# Altium PCB Daughter_PCB.PcbDoc
Units mil, origin at the board's own origin, x right, y up, seen from the top; angles counter-clockwise.
Board outline 1289.97 x 1509.97 mil, 2 copper layers (Top Layer, Bottom Layer); 38 components, 20 nets, 139 pads, 36 vias.
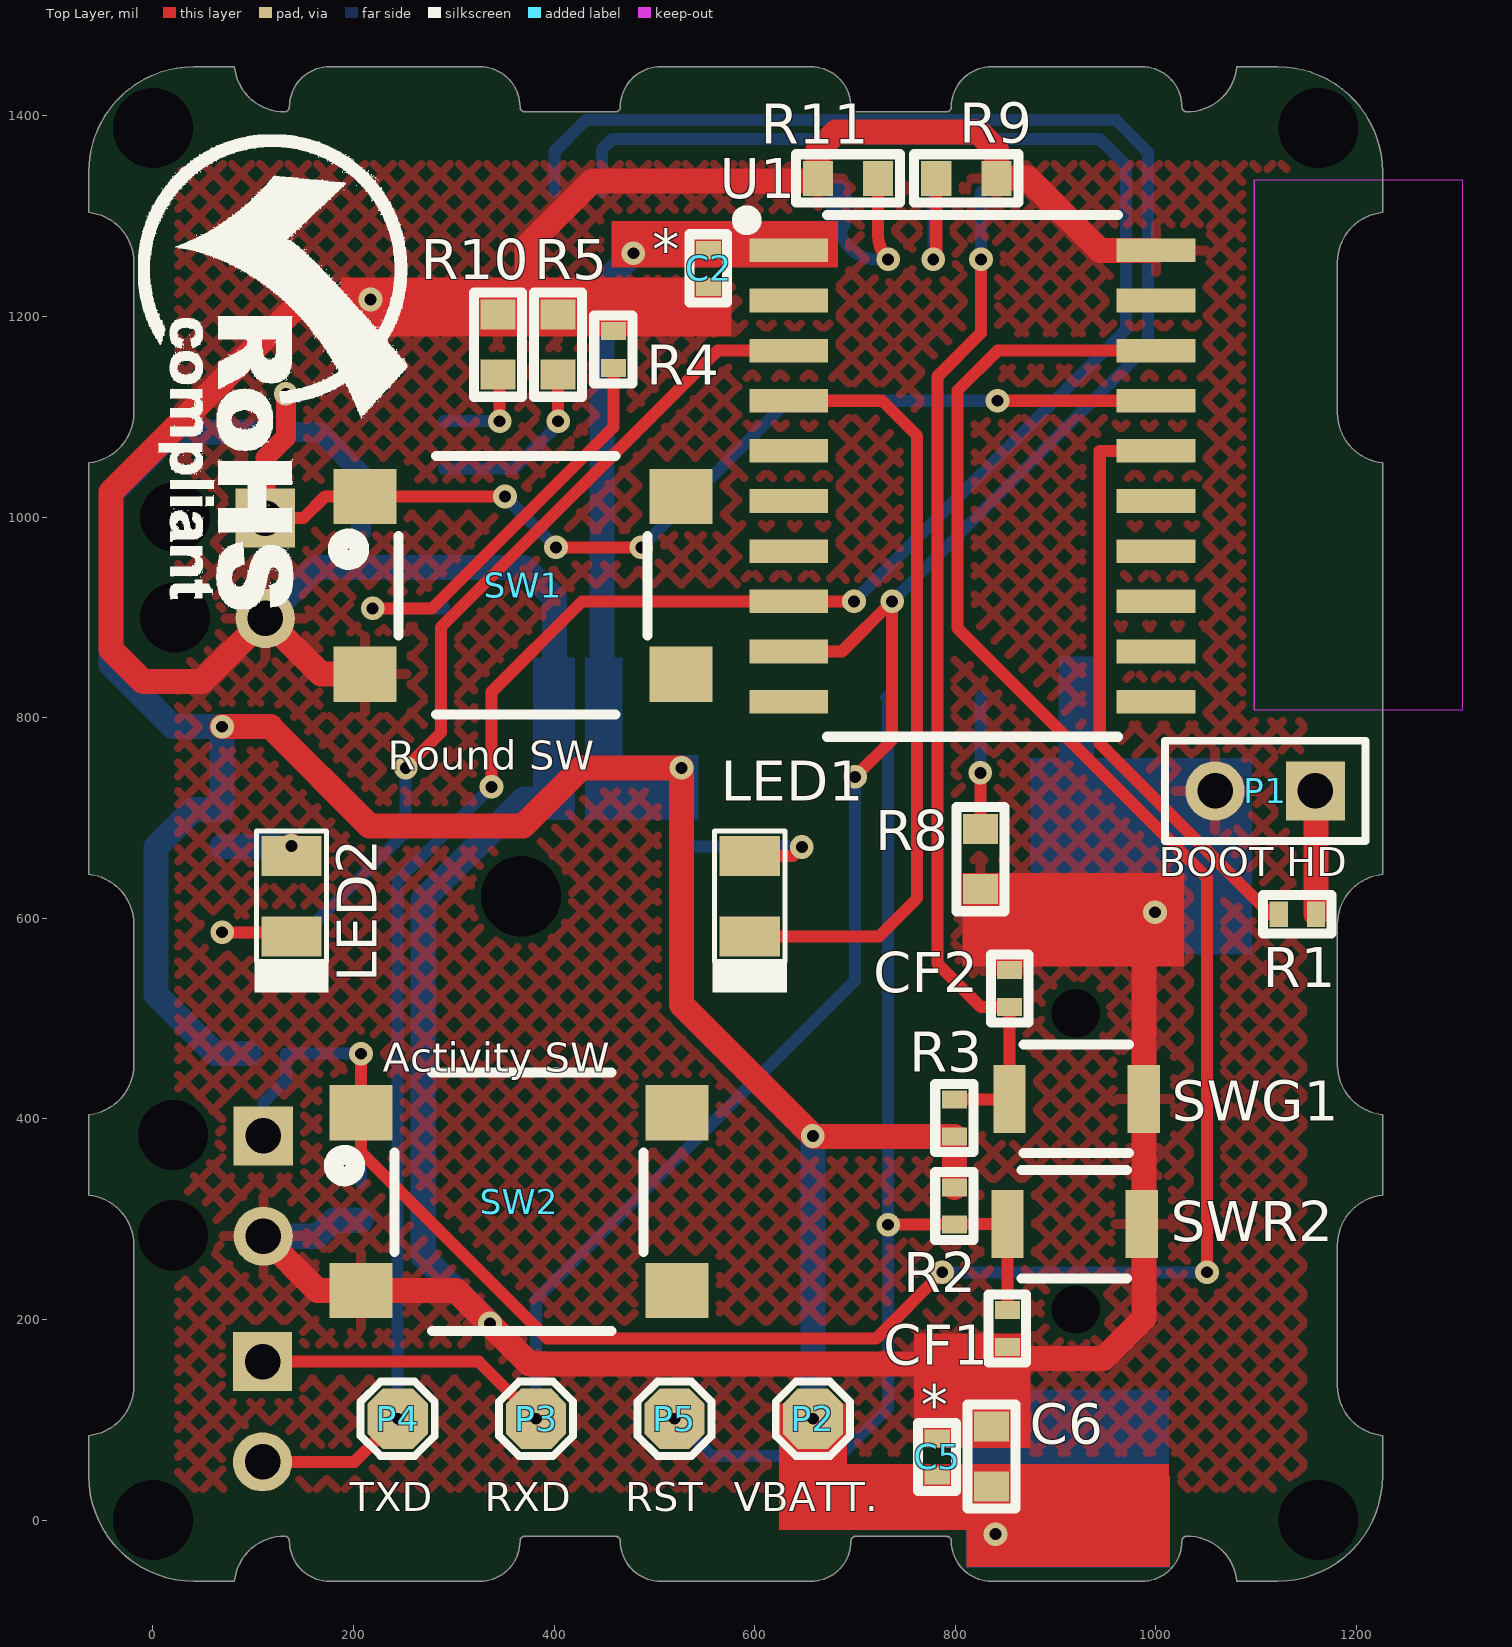
[diagram p0: Top Layer view]
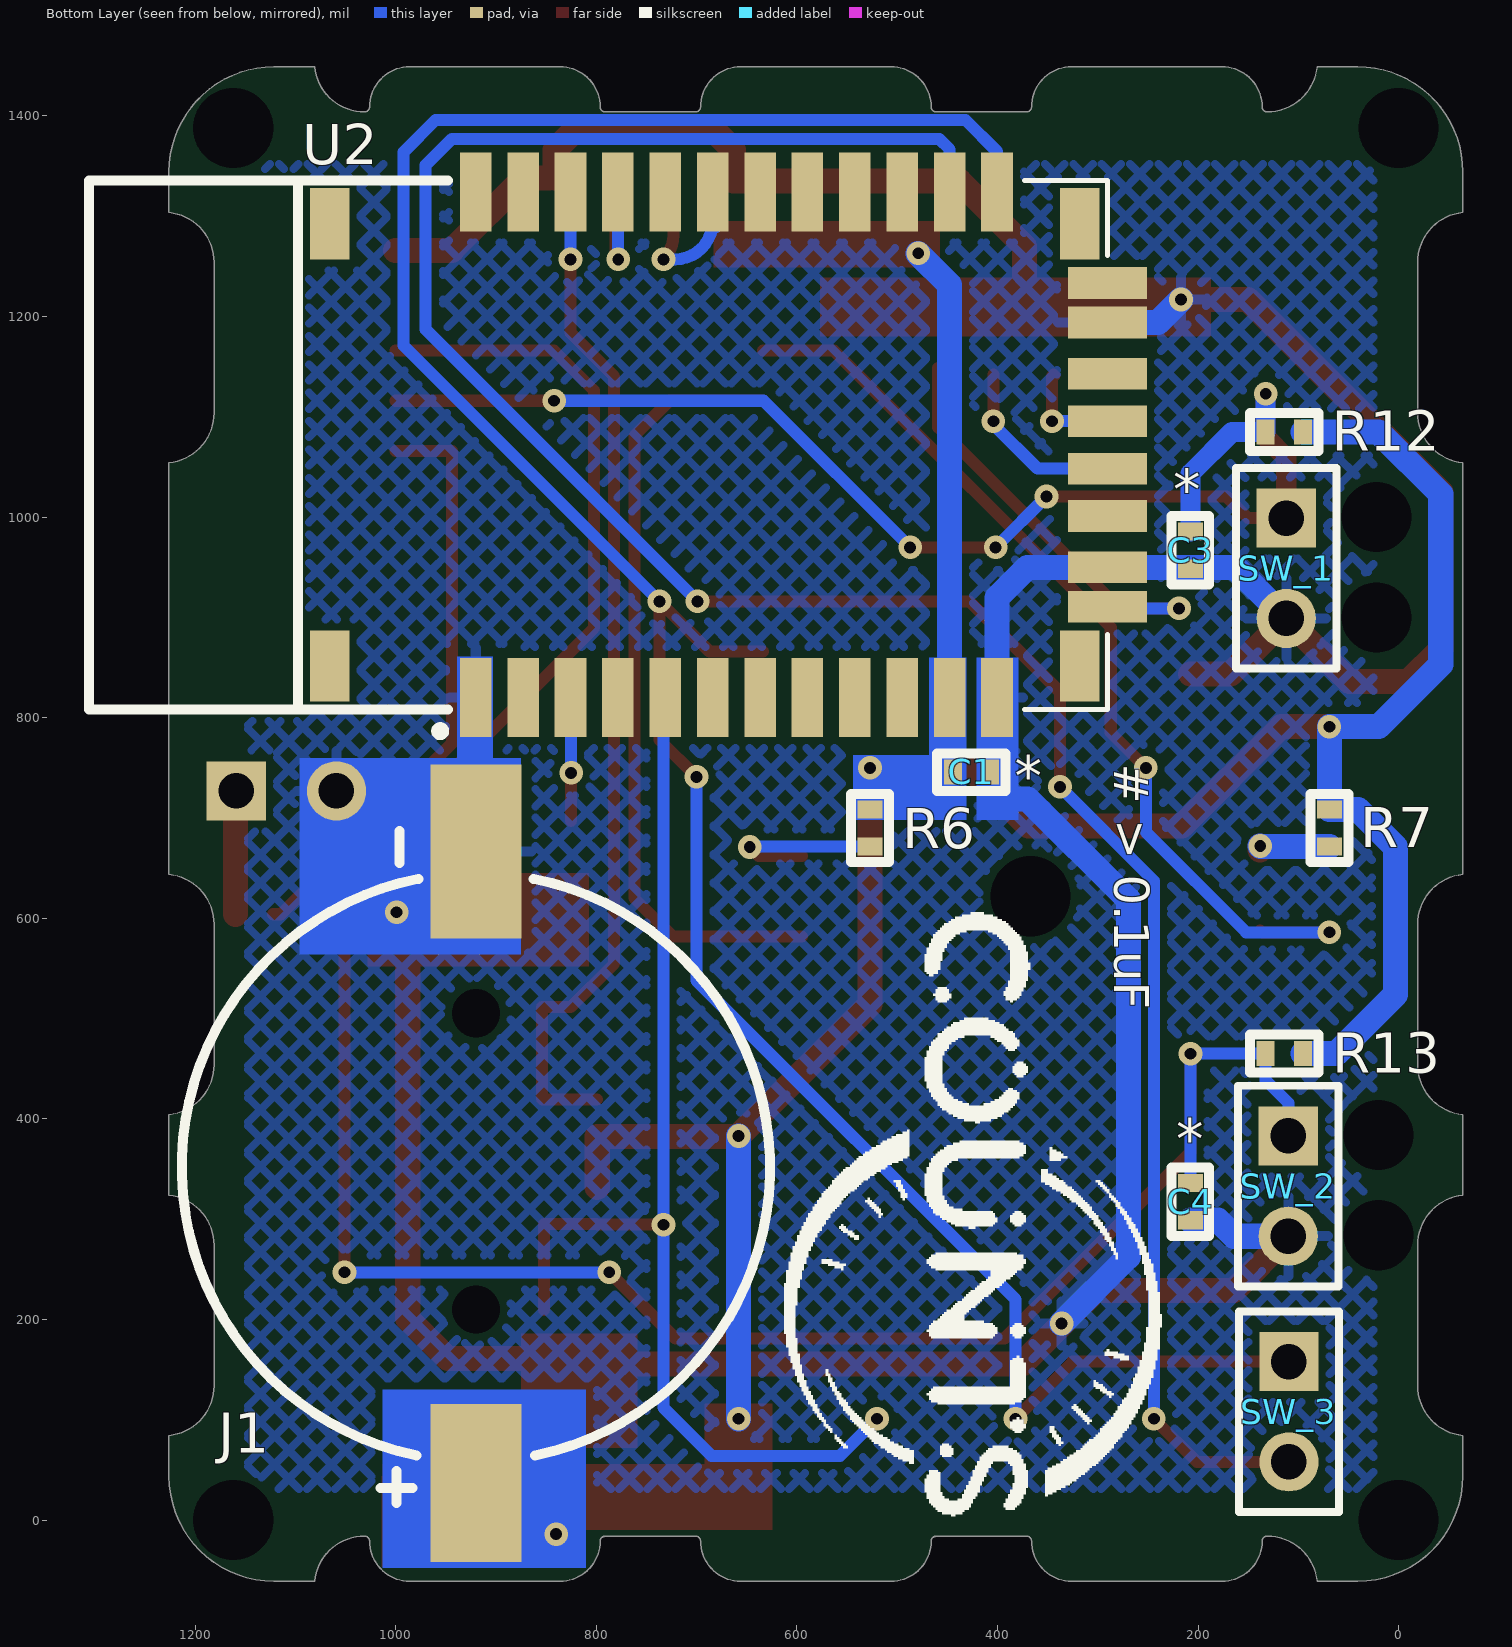
[diagram p1: Bottom Layer view, seen from below]
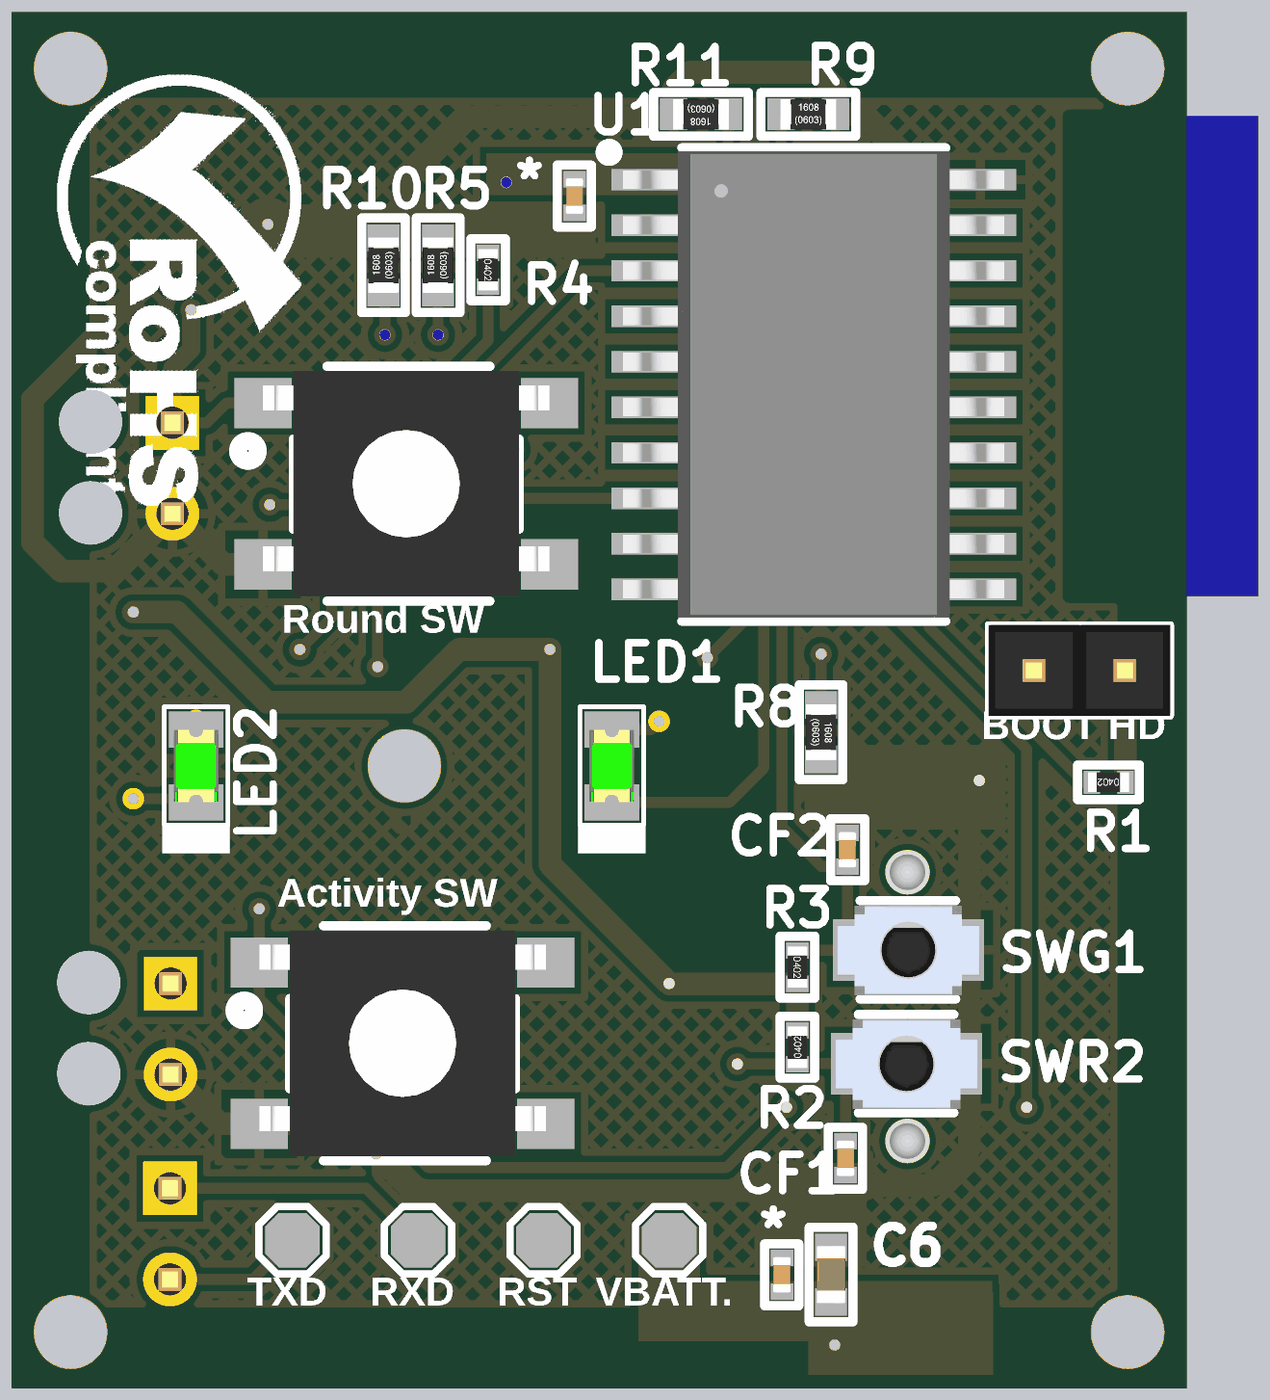
[diagram p2: 3D render of the assembled board from above, using the file's embedded part models]
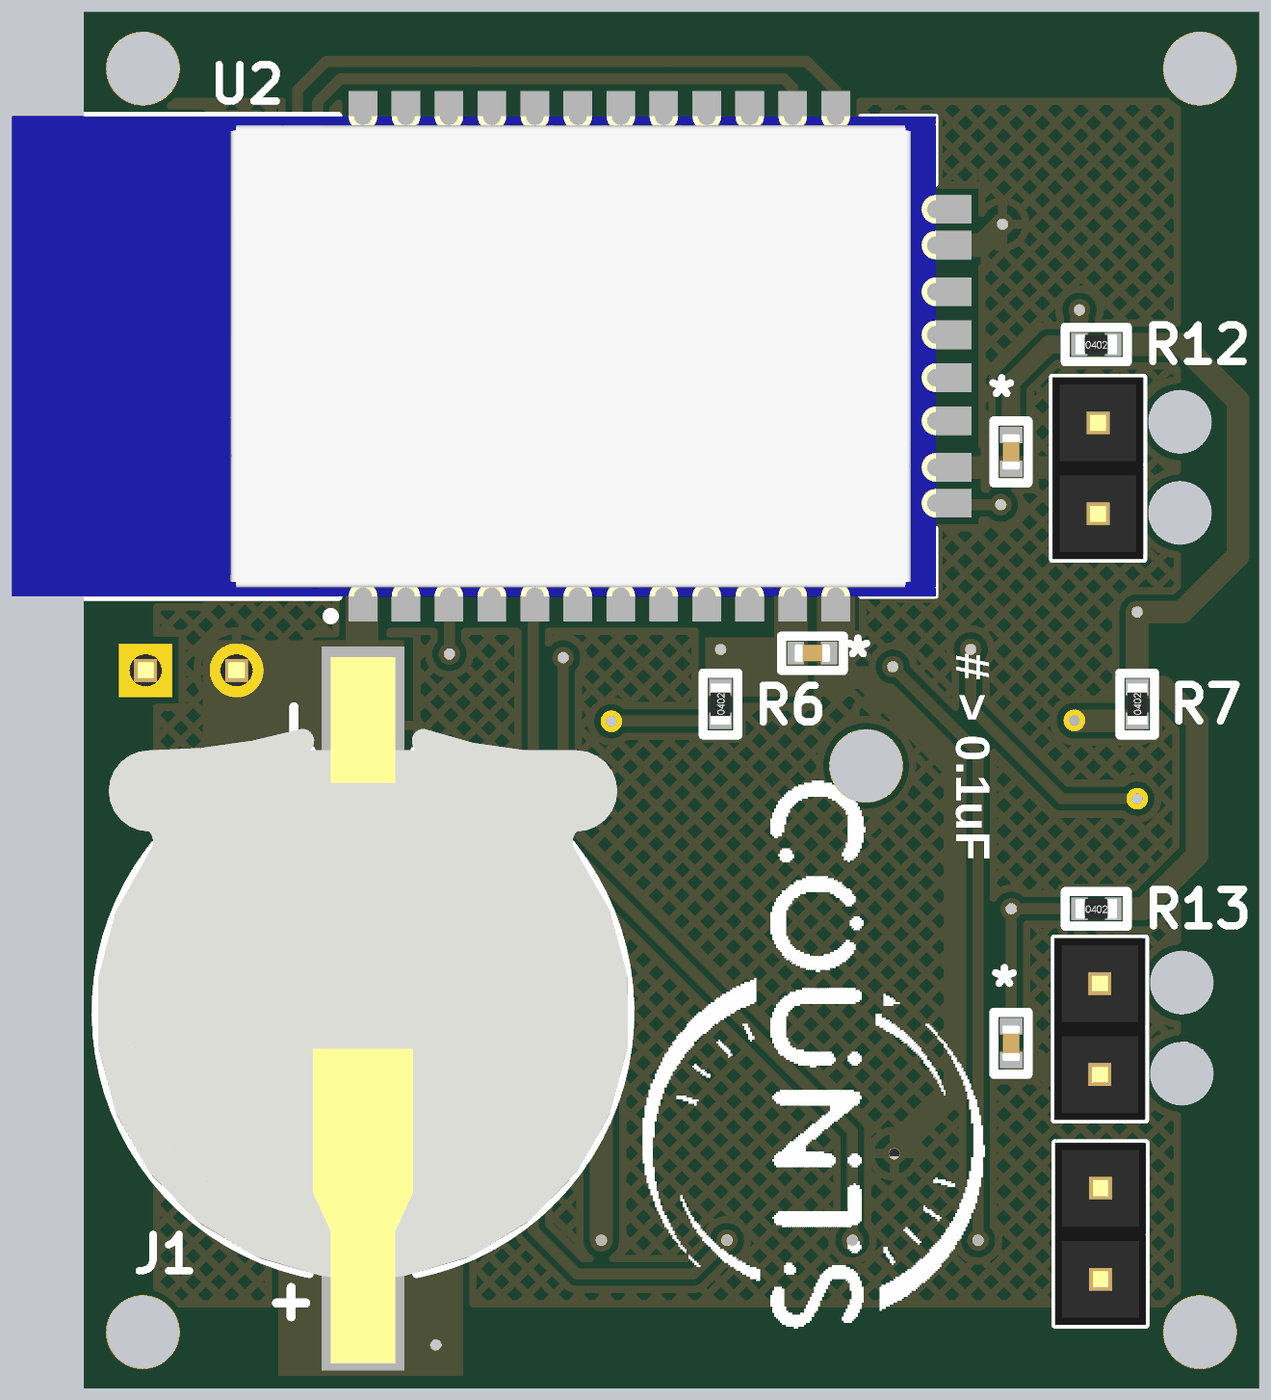
[diagram p3: 3D render of the assembled board from below, using the file's embedded part models]

## Layer stack, top to bottom
Top Solder: solder mask 0.4, Solder Resist, Dk 3.5
Top Layer: signal copper 1.4
Dielectric 1: dielectric 12.6, FR-4, Dk 4.8
Bottom Layer: signal copper 1.4
Bottom Solder: solder mask 0.4, Solder Resist, Dk 3.5

## Board outline
-63.99,43.69 cw(c40.72,43.72) -63.99,43.72 -63.99,84.24 ccw(c-69,134) -18.98,134 -18.98,274 cw(c-24,274) -18.98,273.91 -18.98,274 ccw(c-69,274) -63.98,323.76 -63.98,404.24 ccw(c-69,454) -18.98,454 -18.98,594 cw(c-24,594) -18.98,593.91 -18.98,594 ccw(c-69,594) -63.98,643.76 -63.98,729 ccw(c-69,729) -63.98,729.07 -63.98,1054.24 ccw(c-69,1104) -18.98,1104 -18.98,1254 ccw(c-69,1254) -63.98,1303.76 -63.98,1344.28 cw(c40.72,1344.28) 40.72,1448.99 ccw(c40.72,1454) 40.83,1448.99 81.24,1448.99 ccw(c131,1454) 131,1403.99 ccw(c131,1409) 136.02,1409 cw(c176,1409) 176,1448.99 326,1448.99 cw(c326,1409) 365.99,1409 ccw(c371,1409) 371,1403.99 461,1403.99 ccw(c461,1409) 464.55,1405.46 ccw(c461,1409) 466.02,1409 cw(c506,1409) 506,1448.99 656,1448.99 cw(c656,1409) 695.99,1409 ccw(c701,1409) 701,1403.99 791,1403.99 ccw(c791,1409) 794.55,1405.46 ccw(c791,1409) 796.02,1409 cw(c836,1409) 836,1448.99 986,1448.99 cw(c986,1409) 1025.99,1409 ccw(c1031,1409) 1031,1403.99 ccw(c1031,1454) 1080.76,1448.99 1121.28,1448.99 cw(c1121.28,1454) 1121.17,1448.99 1121.28,1448.99 cw(c1121.28,1344.28) 1225.99,1344.28 1225.99,1303.76 ccw(c1231,1254) 1180.99,1254 1180.99,1104 ccw(c1231,1104) 1225.99,1054.24 1225.99,729 ccw(c1231,729) 1225.99,729 cw(c1231,729) 1225.99,729.07 1225.99,729 1225.99,643.76 ccw(c1231,594) 1180.98,594 ccw(c1186,594) 1180.99,593.91 1180.99,454 ccw(c1231,454) 1225.99,404.24 1225.99,323.76 ccw(c1231,274) 1180.99,274 ccw(c1186,274) 1180.99,273.91 1180.99,134 cw(c1186,134) 1180.99,134.08 1180.99,134 ccw(c1231,134) 1225.99,84.24 1225.99,43.72 cw(c1121.28,43.72) 1225.99,43.69 cw(c1231,43.72) 1225.99,43.75 1225.99,43.69 cw(c1121.28,43.72) 1121.28,-60.99 ccw(c1121.28,-66) 1121.17,-60.99 1080.76,-60.99 ccw(c1031,-66) 1031,-15.99 ccw(c1031,-21) 1025.99,-21 cw(c986,-21) 986,-60.99 836,-60.99 cw(c836,-21) 796.02,-21 ccw(c791,-21) 794.55,-17.46 ccw(c791,-21) 791,-15.99 cw(c791,-21) 794.55,-17.46 791,-15.99 701,-15.99 ccw(c701,-21) 695.99,-21 cw(c656,-21) 656,-60.99 506,-60.99 cw(c506,-21) 466.02,-21 ccw(c461,-21) 464.55,-17.46 ccw(c461,-21) 461,-15.99 cw(c461,-21) 464.55,-17.46 461,-15.99 371,-15.99 ccw(c371,-21) 365.99,-21 cw(c326,-21) 326,-60.99 176,-60.99 cw(c176,-21) 136.02,-21 ccw(c131,-21) 131,-15.99 ccw(c131,-66) 81.24,-60.99 40.72,-60.99 cw(c40.72,43.72)

## Design rules (kind name [scope] priority, off if disabled: settings)
Clearance [All] p1: gap=7 ignorepadtopadclearanceinfootprint=FALSE
HoleSize [All] p1: absolutevalues=TRUE maxlimit=10000 minlimit=1 maxpercent=80.000 minpercent=20.000
HoleToHoleClearance [All] p1: gap=0 allowstackedmicrovias=TRUE
MinimumSolderMaskSliver [All] p1: minsoldermaskwidth=0
PolygonConnect [All] p1: connectstyle=Relief reliefconductorwidth=10 reliefentries=4 polygonreliefangle="90 Angle" airgapwidth=10
RoutingVias [All] p1: holewidth=11.81 width=23.62 viastyle="Through Hole" minholewidth=11.81 minwidth=23.62 maxholewidth=11.81 maxwidth=23.62
SilkToSilkClearance [All] p1: silktosilkclearance=0
SilkToSolderMaskClearance [IsPad] p1: minsilkscreentomaskgap=0 clearancetoexposedcopper=TRUE
SolderMaskExpansion SolderMaskExpansion_1 [Not IsVia] p1: expansion=4
SolderMaskExpansion [IsVia] p2: expansion=4 soldermaskfromhole=TRUE
Width [All] p1: maxlimit=50 minlimit=10 preferedwidth=12 minimp=50.000000 maximp=50.000000 favimp=50.000000
25 further rules are at their usual default settings.

## Classes and differential pairs
component class U_Power_Section: C5 C6 J1 P2
component class U_Peripheral_Section: C2 CF1 CF2 P5 R2 R3 R4 R5 R8 R9 R10 R11 SWG1 SWR2 U2
component class U_Controller_Section: C1 C3 C4 LED1 LED2 P1 P3 P4 R1 R6 R7 R12 R13 SW1 SW2 SW_1 SW_2 SW_3 U1

## Components (designator, comment, footprint, x,y, rotation, side; value= is the part's Value field where it differs from the comment)
C1 "0.1uF" Cap0402 426,746 r180 bottom
C2 "0.1uF" Cap0402 554,1248 r270 top
C3 "0.1uF" Cap0402 207.52,967 r270 bottom
C4 "0.1uF" Cap0402 207.52,317.41 r270 bottom
C5 "0.1uF" Cap0402 782,63 r270 top
C6 "1uF" Cap0603 836.01,63.3 r90 top
CF1 "0.1uF" Cap0402 852,191 r270 top
CF2 "0.1uF" Cap0402 854,530 r90 top
J1 "CR1220-2" CR1220-2 920,351.73 r90 bottom locked value=Cuctom
LED1 "LTST-C171KRKT" "LED 0805" 595,622 r270 top
LED2 "LTST-C171KGKT" "LED 0805" 138.01,622 r270 top
P1 "61300211121" HDR1X2 1159,727 r180 top
P2 "Test Point" "TEST POINT" 658,101 r0 top
P3 "Test Point" "TEST POINT" 382,101 r0 top
P4 "Test Point" "TEST POINT" 244,101 r0 top
P5 "Test Point" "TEST POINT" 520,101 r0 top
R1 "4.7K" Res0402 1141,604 r180 top
R2 "10K" Res0402 799,313 r90 top
R3 "10K" Res0402 799,401 r270 top
R4 "10K" Res0402 459,1167 r270 top
R5 "100K" Res0603 404,1172 r90 top
R6 "470R" Res0402 527,690 r90 bottom
R7 "470R" Res0402 69,690 r90 bottom
R8 "100K" Res0603 825,659 r270 top
R9 "100K" Res0603 811,1337.78 r0 top
R10 "100K" Res0603 344,1172 r90 top
R11 "100K" Res0603 693,1337.78 r180 top
R12 "10K" Res0402 114,1085 r180 bottom
R13 "10K" Res0402 114,465 r180 bottom
SW1 "B3FS-1012P" B3FS-1012P 369,932 r180 top locked
SW2 "B3FS-1012P" B3FS-1012P 365,317.42 r180 top locked
SW_1 "61300211121" HDR1X2 112,999 r270 bottom locked
SW_2 "61300211121" HDR1X2 110,383 r270 bottom locked
SW_3 "61300211121" HDR1X2 109.3,158 r270 bottom locked
SWG1 "B3U-1000P" B3U-1000P 921,420 r0 top
SWR2 "B3U-1000P" B3U-1000P 919,295 r0 top
U1 "ATTINY1616-SFR" ATTINY1616-SFR 817,1041 r0 top locked
U2 "RN42-I/RM" RN42-I/RM 678,1072 r90 bottom locked

## Footprints (in the part's own frame and the unit in brackets; to place one, negate y for a bottom-side part, rotate by r counter-clockwise, add the part's x,y. Pads: shape width x height; smd on the part's side, far side on the other; paste and mask are expansions set on the pad)
ATTINY1616-SFR [mm]
  rect 2x0.6 smd: 1(-4.65,5.715) 2(-4.65,4.445) 3(-4.65,3.175) 4(-4.65,1.905) 5(-4.65,0.635) 6(-4.65,-0.635) 7(-4.65,-1.905) 8(-4.65,-3.175) 9(-4.65,-4.445) 10(-4.65,-5.715) 11(4.65,-5.715) 12(4.65,-4.445) 13(4.65,-3.175) 14(4.65,-1.905) 15(4.65,-0.635) 16(4.65,0.635) 17(4.65,1.905) 18(4.65,3.175) 19(4.65,4.445) 20(4.65,5.715)
  silkscreen extent -5.84,-6.6 3.68,6.6, body extent -5.32,-6.5 5.32,6.5, height 2.64
B3FS-1012P [mm]
  rect 1.6x1.4 smd: 1(4,-2.25) 2(-4,-2.25) 3(4,2.25) 4(-4,2.25)
  silkscreen extent -3.15,-3.28 4.69,3.28, body extent -4,-3.15 4,3.15, height 3.1
B3U-1000P [mm] "SWITCH TACTILE SPST-NO 0.05A 12V"
  rect 0.82x1.72 smd: 1(-1.7,0) 2(1.7,0)
  silkscreen extent -1.35,-1.37 1.32,1.37, body extent -2,-1.26 2,1.24, height 1.6
Cap0402 [mil]
  rect 18x25 smd: 1(-18.5,0) 2(18.5,0)
  silkscreen extent -34,-19 34,19, body extent -20,-10 20,10, height 19
Cap0603 [mil]
  rect 30x35 smd: 1(30,0) 2(-30,0)
  silkscreen extent -52,-24 52,24, body extent -31,-16 32,16, height 34
CR1220-2 [mm]
  rect 4x2.3 smd: 1(-8,0)
  rect 4.4x2.3 smd: 2(8,0)
  round 0 hole 1.22: MH1(-3.6,0) MH2(3.9,0)
  silkscreen extent -8.5,-7.45 8.52,7.45, body extent -9.8,-7.45 9.9,7.45, height 4
HDR1X2 [mm] "CONN HEADER VERT 2POS 2.54MM"
  rect 1.5x1.5 hole 0.9: 1(0,0)
  round 1.5 hole 0.9: 2(2.54,0)
  silkscreen extent -1.27,-1.27 3.81,1.27, body extent -1.27,-1.27 3.81,1.27, height 8.44
"LED 0805" [mil]
  rect 40x60 smd: 1(-39.99,0.01) 2(40.01,0.01)
  silkscreen extent -65,-37 96,37, body extent -40,-25 40,25, height 43
Res0402 [mil]
  rect 18x25 smd: 1(-18.5,0) 2(18.5,0)
  silkscreen extent -34,-19 34,19, body extent -23,-11 23,11, height 16
Res0603 [mil]
  rect 30x35 smd: 1(30,0) 2(-30,0)
  silkscreen extent -52,-24 52,24, body extent -31,-17 31,17, height 18
RN42-I/RM [mm]
  rect 2x0.8 smd: 1(-6.4,6.15) 2(-6.4,4.95) 3(-6.4,3.75) 4(-6.4,2.55) 5(-6.4,1.35) 6(-6.4,0.15) 7(-6.4,-1.05) 8(-6.4,-2.25) 9(-6.4,-3.45) 10(-6.4,-4.65) 11(-6.4,-5.85) 12(-6.4,-7.05) 13(6.4,-7.05) 14(6.4,-5.85) 15(6.4,-4.65) 16(6.4,-3.45) 17(6.4,-2.25) 18(6.4,-1.05) 19(6.4,0.15) 20(6.4,1.35) 21(6.4,2.55) 22(6.4,3.75) 23(6.4,4.95) 24(6.4,6.15)
  rect 0.8x2 smd: 28(3.1,-9.85) 29(-3.1,-9.85) 30(4.1,-9.85) 31(1.8,-9.85) 32(0.6,-9.85) 33(-0.6,-9.85) 34(-1.8,-9.85) 35(-4.1,-9.85)
  rect 1.8x1 smd: S1(-5.6,-9.15) S2(5.6,-9.15) S3(5.6,9.85) S4(-5.6,9.85)
  Keep-Out Layer region: 6.7,10.657 -6.704,10.657 -6.704,15.95 6.7,15.95
  Keep-Out Layer region: 6.7,10.667 -6.71,10.667 -6.71,15.95 6.7,15.95
  silkscreen extent -7.35,-9.85 6.7,15.95, body extent -6.7,-9.85 6.7,15.95, height 2.4
"TEST POINT" [mil]
  oct 60x60 smd: 1(0,0)
  silkscreen extent -37,-37 37,37

## Part data
C1 C2 C3 C4 C5 CF1 CF2: library part CC0402KRX7R7BB104, "CAP CER 0.1UF 16V X7R 0402", Capacitance=100nF, Case/Package=0402, Case Code (Metric)=1005, Dielectric=X7R, Manufacturer=Yageo, Max Operating Temperature=125°C, Min Operating Temperature=-55°C, Package Quantity=1, Supplier Part Number 1=311-1338-1-ND, Tolerance=10%, Voltage=16V, Case Code (Imperial)=0402, ComponentLink1Description=http://www.yageo.com/documents/recent/UPY-GPHC_X7R_6.3V-to-50V_8.pdf?src-supplier=Avnet+Europe, ComponentLink1URL=http://www.yageo.com/documents/recent/UPY-GPHC_X7R_6.3V-to-50V_8.pdf?src-supplier=Avnet+Europe, ComponentLink2Description=http://www.yageo.com/documents/recent/UPY-GPHC_X7R_6.3V-to-50V_18.pdf?src-supplier=Digi-Key, ComponentLink2URL=http://www.yageo.com/documents/recent/UPY-GPHC_X7R_6.3V-to-50V_18.pdf?src-supplier=Digi-Key, ComponentLink3Description=http://www.yageo.com/documents/recent/UPY-GPHC_X7R_6.3V-to-50V_8.pdf?src-supplier=Avnet, ComponentLink3URL=http://www.yageo.com/documents/recent/UPY-GPHC_X7R_6.3V-to-50V_8.pdf?src-supplier=Avnet, ComponentLink4Description=http://www.yageo.com/documents/recent/UPY-GPHC_X7R_6.3V-to-50V_18.pdf?src-supplier=Mouser, ComponentLink4URL=http://www.yageo.com/documents/recent/UPY-GPHC_X7R_6.3V-to-50V_18.pdf?src-supplier=Mouser, ComponentLink5Description=http://www.farnell.com/datasheets/2167236.pdf?src-supplier=Element14, ComponentLink5URL=http://www.farnell.com/datasheets/2167236.pdf?src-supplier=Element14, ComponentLink6Description=http://www.farnell.com/datasheets/1489800.pdf?src-supplier=Element14, ComponentLink6URL=http://www.farnell.com/datasheets/1489800.pdf?src-supplier=Element14, Composition=Ceramic, Depth=0.5mm, Halogen Free="Halogen Free", Height=0.5mm, Lead Free="Lead Free", Length=1mm, Manufacturer Part Number=CC0402KRX7R7BB104, Mount="Surface Mount", Number of Pins=2, Packaging="Tape and Reel", Pricing 1="1=0.1, 10=0.034, 100=0.015, 500=0.0107, 1000=0.00841, 2500=0.00764, 5000=0.00703 (USD)", Radiation Hardening=No, REACH SVHC="No SVHC", Stock 1=16982736, Supplier 1=Digi-Key, Termination=SMD/SMT, Thickness=0.022inch, Voltage Rating=16V, Voltage Rating (DC)=16V, Width=0.02inch
C6: library part UMK107AB7105KA-T, "CAP CER 1UF 50V X7R 0603", Case/Package=0603, Case Code (Metric)=1608, Dielectric=X7R, Manufacturer="Taiyo Yuden", Max Operating Temperature=125°C, Min Operating Temperature=-55°C, Package Quantity=1, Supplier Part Number 1=587-3247-1-ND, Tolerance=10%, Voltage Rating=50V, Capacitance=1uF, Case Code (Imperial)=0603, ComponentLink1Description=http://www.farnell.com/datasheets/2048165.pdf?src-supplier=Element14, ComponentLink1URL=http://www.farnell.com/datasheets/2048165.pdf?src-supplier=Element14, ComponentLink2Description=https://www.murata.com/~/media/webrenewal/support/library/catalog/products/capacitor/mlcc/c02e.ashx?la=en-us&src-supplier=Digi-Key, ComponentLink2URL=https://www.murata.com/~/media/webrenewal/support/library/catalog/products/capacitor/mlcc/c02e.ashx?la=en-us&src-supplier=Digi-Key, ComponentLink3Description=https://www.yuden.co.jp/productdata/catalog/mlcc_all_e.pdf?src-supplier=Digi-Key, ComponentLink3URL=https://www.yuden.co.jp/productdata/catalog/mlcc_all_e.pdf?src-supplier=Digi-Key, ComponentLink4Description=https://www.yuden.co.jp/productdata/catalog/mlcc_all_e.pdf?src-supplier=Onlinecomponents.com, ComponentLink4URL=https://www.yuden.co.jp/productdata/catalog/mlcc_all_e.pdf?src-supplier=Onlinecomponents.com, Depth=0.8mm, Halogen Free="Halogen Free", Height=0.8mm, Length=1.6mm, Manufacturer Part Number=UMK107AB7105KA-T, Mount="Surface Mount", Packaging="Tape and Reel", Pricing 1="1=0.28, 10=0.19, 100=0.1079, 500=0.0762, 1000=0.0667 (USD)", Radiation Hardening=No, Stock 1=453098, Supplier 1=Digi-Key, Termination=SMD/SMT, Thickness=0.037inch, Voltage Rating (DC)=50V, Width=0.031inch
J1: "SMD Battery Holders, Clips & Contacts RoHS", Manufacturer=Q&J, Package=Cuctom, Manufacturer Part No=CR1220-2
LED1: "LED RED CLEAR SMD 0805", Case/Package=0805, Case Code (Metric)=2012, Color=Red, Forward Current=30mA, Forward Voltage=2V, Lens Color=Colorless, Manufacturer="Vishay Lite-On", Max Operating Temperature=85°C, Min Operating Temperature=-55°C, Package Quantity=3000, Power Dissipation=75mW, Reverse Voltage=5V, Supplier Part Number 1=160-1427-1-ND, Test Current=20mA, Case Code (Imperial)=0805, ComponentLink1Description=https://www.verical.com/server-webapp/html/getDatasheet?partID=141494&src-supplier=Verical, ComponentLink1URL=https://www.verical.com/server-webapp/html/getDatasheet?partID=141494&src-supplier=Verical, ComponentLink2Description=http://optoelectronics.liteon.com/upload/download/DS22-2000-074/LTST-C190KGKT.PDF?src-supplier=Digi-Key, ComponentLink2URL=http://optoelectronics.liteon.com/upload/download/DS22-2000-074/LTST-C190KGKT.PDF?src-supplier=Digi-Key, ComponentLink3Description=http://www.mouser.com/ds/2/239/LTST-C190KGKT-1141861.pdf?src-supplier=Mouser, ComponentLink3URL=http://www.mouser.com/ds/2/239/LTST-C190KGKT-1141861.pdf?src-supplier=Mouser, ComponentLink4Description=http://uk.rs-online.com/webdocs/0dc0/0900766b80dc02a8.pdf?src-supplier=RSComponents, ComponentLink4URL=http://uk.rs-online.com/webdocs/0dc0/0900766b80dc02a8.pdf?src-supplier=RSComponents, ComponentLink5Description=http://optoelectronics.liteon.com/upload/download/DS22-2000-109/LTST-C171KRKT.pdf?src-supplier=Digi-Key, ComponentLink5URL=http://optoelectronics.liteon.com/upload/download/DS22-2000-109/LTST-C171KRKT.pdf?src-supplier=Digi-Key, ComponentLink6Description=http://www.mouser.com/ds/2/239/Lite-On-LTST-C171KRKT-187201.pdf?src-supplier=Mouser, ComponentLink6URL=http://www.mouser.com/ds/2/239/Lite-On-LTST-C171KRKT-187201.pdf?src-supplier=Mouser, ComponentLink7Description=http://uk.rs-online.com/webdocs/0dc0/0900766b80dc0550.pdf?src-supplier=RSComponents, ComponentLink7URL=http://uk.rs-online.com/webdocs/0dc0/0900766b80dc0550.pdf?src-supplier=RSComponents, ComponentLink8Description=http://www1.futureelectronics.com/doc/LITE%20ON/LITE-ON%20LTST-C171KRKT.pdf?src-supplier=Future+Electronics, ComponentLink8URL=http://www1.futureelectronics.com/doc/LITE%20ON/LITE-ON%20LTST-C171KRKT.pdf?src-supplier=Future+Electronics, Depth=1.25mm, Dominant Wavelength=631nm, Height=0.8mm, Illumination Color=Red, Lead Free="Lead Free", Length=2mm, Lens Style=Diffused,Colorless,Rectangular,Clear, Lens Transparency=Clear, Luminous Intensity=54mcd, Manufacturer Part Number=LTST-C171KRKT, Mount="Surface Mount", Number of Elements=1, Number of LEDs=1, Number of Pins=2, Packaging="Tape and Reel", Power Rating=75mW, Pricing 1="1=0.29, 10=0.215, 100=0.1016, 500=0.0677, 1000=0.0531 (USD)", Radiation Hardening=No, Stock 1=75900, Supplier 1=Digi-Key, Viewing Angle=130°, Wavelength=639nm, Width=1.25mm
LED2: "LED GREEN CLEAR SMD 0805", Case/Package=0805, Case Code (Metric)=2012, Color=Green, Forward Current=30mA, Forward Voltage=2.4V, Lens Color=Colorless, Manufacturer="Vishay Lite-On", Max Operating Temperature=85°C, Min Operating Temperature=-55°C, Package Quantity=1, Power Dissipation=75mW, Reverse Voltage=5V, Supplier Part Number 1=160-1426-1-ND, Test Current=20mA, Case Code (Imperial)=0805, ComponentLink1Description=https://www.verical.com/server-webapp/html/getDatasheet?partID=141494&src-supplier=Verical, ComponentLink1URL=https://www.verical.com/server-webapp/html/getDatasheet?partID=141494&src-supplier=Verical, ComponentLink2Description=http://optoelectronics.liteon.com/upload/download/DS22-2000-074/LTST-C190KGKT.PDF?src-supplier=Digi-Key, ComponentLink2URL=http://optoelectronics.liteon.com/upload/download/DS22-2000-074/LTST-C190KGKT.PDF?src-supplier=Digi-Key, ComponentLink3Description=http://www.mouser.com/ds/2/239/LTST-C190KGKT-1141861.pdf?src-supplier=Mouser, ComponentLink3URL=http://www.mouser.com/ds/2/239/LTST-C190KGKT-1141861.pdf?src-supplier=Mouser, ComponentLink4Description=http://uk.rs-online.com/webdocs/0dc0/0900766b80dc02a8.pdf?src-supplier=RSComponents, ComponentLink4URL=http://uk.rs-online.com/webdocs/0dc0/0900766b80dc02a8.pdf?src-supplier=RSComponents, ComponentLink5Description=http://optoelectronics.liteon.com/upload/download/DS22-2000-109/LTST-C171KRKT.pdf?src-supplier=Digi-Key, ComponentLink5URL=http://optoelectronics.liteon.com/upload/download/DS22-2000-109/LTST-C171KRKT.pdf?src-supplier=Digi-Key, ComponentLink6Description=http://www.mouser.com/ds/2/239/Lite-On-LTST-C171KRKT-187201.pdf?src-supplier=Mouser, ComponentLink6URL=http://www.mouser.com/ds/2/239/Lite-On-LTST-C171KRKT-187201.pdf?src-supplier=Mouser, ComponentLink7Description=http://uk.rs-online.com/webdocs/0dc0/0900766b80dc0550.pdf?src-supplier=RSComponents, ComponentLink7URL=http://uk.rs-online.com/webdocs/0dc0/0900766b80dc0550.pdf?src-supplier=RSComponents, ComponentLink8Description=http://www1.futureelectronics.com/doc/LITE%20ON/LITE-ON%20LTST-C171KRKT.pdf?src-supplier=Future+Electronics, ComponentLink8URL=http://www1.futureelectronics.com/doc/LITE%20ON/LITE-ON%20LTST-C171KRKT.pdf?src-supplier=Future+Electronics, ComponentLink9Description=https://www.verical.com/server-webapp/html/getDatasheet?partID=214542&src-supplier=Verical, ComponentLink9URL=https://www.verical.com/server-webapp/html/getDatasheet?partID=214542&src-supplier=Verical, ComponentLink10Description=http://optoelectronics.liteon.com/upload/download/DS22-2000-118/LTST-C171KGKT.pdf?src-supplier=Future+Electronics, ComponentLink10URL=http://optoelectronics.liteon.com/upload/download/DS22-2000-118/LTST-C171KGKT.pdf?src-supplier=Future+Electronics, ComponentLink11Description=http://optoelectronics.liteon.com/upload/download/DS22-2000-118/LTST-C171KGKT.pdf?src-supplier=Digi-Key, ComponentLink11URL=http://optoelectronics.liteon.com/upload/download/DS22-2000-118/LTST-C171KGKT.pdf?src-supplier=Digi-Key, ComponentLink12Description=http://uk.rs-online.com/webdocs/0dc0/0900766b80dc0298.pdf?src-supplier=RSComponents, ComponentLink12URL=http://uk.rs-online.com/webdocs/0dc0/0900766b80dc0298.pdf?src-supplier=RSComponents, ComponentLink13Description=http://www.mouser.com/ds/2/239/Lite-On-LTST-C171KGKT-187692.pdf?src-supplier=Mouser, ComponentLink13URL=http://www.mouser.com/ds/2/239/Lite-On-LTST-C171KGKT-187692.pdf?src-supplier=Mouser, Depth=1.25mm, Dominant Wavelength=571nm, Height=0.8mm, Illumination Color=Green, Lead Free="Lead Free", Length=2mm, Lens Style=Rectangular,Diffused,Colorless,Clear, Lens Transparency=Clear, Luminous Intensity=35mcd, Manufacturer Part Number=LTST-C171KGKT, Mount="Surface Mount", Number of Elements=1, Number of LEDs=1, Number of Pins=2, Packaging="Tape and Reel", Power Rating=75mW, Pricing 1="1=0.29, 10=0.215, 100=0.1016, 500=0.0677, 1000=0.0531 (USD)", Radiation Hardening=No, Stock 1=84966, Supplier 1=Digi-Key, Viewing Angle=130°, Wavelength=574nm, Width=1.25mm
P1 SW_1 SW_2 SW_3: library part "Header 1x2", "CONN HEADER VERT 2POS 2.54MM", Color=Black, Current Rating=3A, Manufacturer="Wurth Electronics", Max Operating Temperature=125°C, Min Operating Temperature=-40°C, Supplier Part Number 1=732-5315-ND, Voltage Rating=250V, ComponentLink1Description=http://www.mouser.com/ds/2/445/6130xx11121-538006.pdf?src-supplier=Mouser, ComponentLink1URL=http://www.mouser.com/ds/2/445/6130xx11121-538006.pdf?src-supplier=Mouser, Connector Type="Male Pin", Contact Gender=Male, Contact Material="Copper Alloy,Copper", Contact Mating Length=0.236inch, Contact Plating=Gold, Gender=Male, Housing Material=PBT, Lead Free="Lead Free", Manufacturer Part Number=61300211121, Mount="Through Hole", Number of Contacts=2, Number of Positions=2, Number of Rows=1, Packaging=Bulk, Pitch=0.1inch, Pricing 1="1=0.13, 10=0.106, 25=0.088, 50=0.074, 100=0.067, 1000=0.061 (USD)", REACH SVHC=Unknown, Stock 1=219205, Supplier 1=Digi-Key, Termination="Through Hole"
P2 P3 P4 P5: library part "TEST POINT", "Test Point ON"
R1: library part CR0402JF0472G, "4.7K ±5% 1/16W ±200ppm/°C 0402 Chip Resistor - Surface Mount RoHS", Manufacturer="LIZ Elec", Package=0402, Manufacturer Part No=CR0402JF0472G
R2 R3 R4 R12 R13: library part RK73B1ETTP103J, "RES 10K OHM 5% 1/10W 0402", Case/Package=0402, Case Code (Metric)=1005, Manufacturer="KOA Speer", Max Operating Temperature=155°C, Min Operating Temperature=-55°C, Package Quantity=10000, Power Rating=63mW, Resistance=10kR, Supplier Part Number 1=2019-RK73B1ETTP103JCT-ND, Temperature Coefficient=200ppm/°C, Tolerance=5%, Voltage Rating=50V, Case Code (Imperial)=0402, ComponentLink1Description=https://www.verical.com/server-webapp/html/getDatasheet?partID=89073&src-supplier=Verical, ComponentLink1URL=https://www.verical.com/server-webapp/html/getDatasheet?partID=89073&src-supplier=Verical, Composition="Thick Film", Depth=0.5mm, Height=0.35mm, Lead Free="Lead Free", Length=1mm, Manufacturer Part Number=RK73B1ETTP103J, Military Standard=Not, Mount="Surface Mount", Packaging="Tape and Reel", Pricing 1="1=0.1, 10=0.016, 100=0.0065, 1000=0.00292, 2500=0.00253, 5000=0.00209 (USD)", Stock 1=2917894, Supplier 1=Digi-Key, Termination=SMD/SMT, Voltage Rating (DC)=50V, Width=0.5mm
R5 R8 R9 R10 R11: library part RT0603BRD07100KL, "RES SMD 100K OHM 0.1% 1/10W 0603", Case/Package=0603, Case Code (Metric)=1608, Manufacturer=Yageo, Max Operating Temperature=125°C, Max Power Dissipation=100mW, Min Operating Temperature=-55°C, Package Quantity=5000, Resistance=100kR, Supplier Part Number 1=YAG1235CT-ND, Temperature Coefficient=25ppm/°C, Tolerance=0.1%, Voltage Rating=75V, Case Code (Imperial)=0603, ComponentLink1Description=http://documents.rs-components.com/techlib://itc_doclist_GB.htm?stockno=6174810&src-supplier=RSComponents, ComponentLink1URL=http://documents.rs-components.com/techlib://itc_doclist_GB.htm?stockno=6174810&src-supplier=RSComponents, Composition="Thin Film", Depth=0.8mm, Features="Moisture Resistant", Height=0.022inch, Lead Free="Lead Free", Length=1.6mm, Manufacturer Part Number=RT0603BRD07100KL, Military Standard=Not, Mount="Surface Mount", Number of Terminations=2, Packaging="Tape and Reel", Power Rating=100mW, Pricing 1="1=0.39, 10=0.332, 100=0.1298, 1000=0.05435, 2500=0.04982 (USD)", Stock 1=53395, Supplier 1=Digi-Key, Termination=SMD/SMT, Voltage Rating (DC)=75V, Width=0.031inch, Working Voltage=75V
R6 R7: library part RTT02471JTH, "470 ±5% 1/16W ±100ppm/°C 0402 Chip Resistor - Surface Mount RoHS", Manufacturer=RALEC, Package=0402, Manufacturer Part No=RTT02471JTH
SW1 SW2: "SWITCH TACTILE SPST-NO 0.05A 24V", Case/Package=SMD/SMT, Contact Resistance=100mR, Current Rating=50mA, Manufacturer=Omron, Max Operating Temperature=70°C, Max Voltage Rating (DC)=24V, Min Operating Temperature=-20°C, Operating Force=1.47N, Package Quantity=1, Supplier Part Number 1=SW1237CT-ND, Actuator Length=1.7mm, Actuator Type=Standard, ComponentLink1Description=https://omronfs.omron.com/en_US/ecb/products/pdf/en-b3fs.pdf?src-supplier=Digi-Key, ComponentLink1URL=https://omronfs.omron.com/en_US/ecb/products/pdf/en-b3fs.pdf?src-supplier=Digi-Key, ComponentLink2Description=http://omronfs.omron.com/en_US/ecb/products/pdf/en-b3fs.pdf?src-supplier=Digi-Key, ComponentLink2URL=http://omronfs.omron.com/en_US/ecb/products/pdf/en-b3fs.pdf?src-supplier=Digi-Key, Contact Plating=Silver, Depth=8mm, Electrical Life=300000Cycles, Illumination Type=Non-Illuminated, Length=6.3mm, Manufacturer Part Number=B3FS-1012P, Max Current Rating=50mA, Mechanical Life=300000Cycles, Mount="Surface Mount", Orientation=Straight, Packaging="Tape and Reel", Pricing 1="1=0.59, 10=0.569, 25=0.548, 100=0.4741, 250=0.43192, 500=0.40034 (USD)", Radiation Hardening=No, Stock 1=177804, Supplier 1=Digi-Key, Switch Function=Off-Mom, Switch Travel=0.25mm, Termination="Gull Wing", Throw Configuration=SPST, Voltage Rating (DC)=24V, Weight=0.2g
SWG1 SWR2: "SWITCH TACTILE SPST-NO 0.05A 12V", Contact Current Rating=50mA, Contact Resistance=100mR, Insulation Resistance=100MR, Manufacturer=Omron, Max Operating Temperature=70°C, Max Voltage Rating (DC)=12V, Min Operating Temperature=-25°C, Operating Force=1.5N, Package Quantity=1, Ratings="Dust Proof,IP40", Supplier Part Number 1=SW1020DKR-ND, Actuator Length=0.4mm, Actuator Type=Standard, ComponentLink1Description=http://www.farnell.com/datasheets/60838.pdf?src-supplier=Farnell, ComponentLink1URL=http://www.farnell.com/datasheets/60838.pdf?src-supplier=Farnell, ComponentLink2Description=http://www.farnell.com/datasheets/60838.pdf?src-supplier=Element14, ComponentLink2URL=http://www.farnell.com/datasheets/60838.pdf?src-supplier=Element14, ComponentLink3Description=https://omronfs.omron.com/en_US/ecb/products/pdf/en-b3u.pdf?src-supplier=Digi-Key, ComponentLink3URL=https://omronfs.omron.com/en_US/ecb/products/pdf/en-b3u.pdf?src-supplier=Digi-Key, ComponentLink4Description=http://www.omron.com/ecb/products/pdf/en-b3u.pdf?src-supplier=Digi-Key, ComponentLink4URL=http://www.omron.com/ecb/products/pdf/en-b3u.pdf?src-supplier=Digi-Key, ComponentLink5Description=https://www.distrelec.biz/Web/Downloads/he/et/B3U_eng_datasheet.pdf?mime=application%2Fpdf&src-supplier=Distrelec, ComponentLink5URL=https://www.distrelec.biz/Web/Downloads/he/et/B3U_eng_datasheet.pdf?mime=application%2Fpdf&src-supplier=Distrelec, ComponentLink6Description=http://www.onlinecomponents.com/productFiles/mf-OM/en-b3u.pdf?src-supplier=Onlinecomponents.com, ComponentLink6URL=http://www.onlinecomponents.com/productFiles/mf-OM/en-b3u.pdf?src-supplier=Onlinecomponents.com, ComponentLink7Description=https://www.verical.com/server-webapp/html/getDatasheet?partID=552554&src-supplier=Verical, ComponentLink7URL=https://www.verical.com/server-webapp/html/getDatasheet?partID=552554&src-supplier=Verical, ComponentLink8Description=http://www.farnell.com/datasheets/1685550.pdf?src-supplier=Element14, ComponentLink8URL=http://www.farnell.com/datasheets/1685550.pdf?src-supplier=Element14, ComponentLink9Description=http://www.farnell.com/datasheets/2610940.pdf?src-supplier=Farnell, ComponentLink9URL=http://www.farnell.com/datasheets/2610940.pdf?src-supplier=Farnell, ComponentLink10Description=https://www.alliedelec.com/m/d/4c8a9ef82804fc3c241a13c1e298fd73.pdf?src-supplier=Allied+Electronics, ComponentLink10URL=https://www.alliedelec.com/m/d/4c8a9ef82804fc3c241a13c1e298fd73.pdf?src-supplier=Allied+Electronics, Contact Material=Silver, Current Rating=50mA, Depth=2.5mm, Electrical Life=200000Cycles, Height=1.2mm, Illumination Type=Non-Illuminated,Illuminated, Lead Free="Lead Free", Length=4mm, Manufacturer Part Number=B3U-1000P, Max Current Rating=50mA, Mechanical Life=200000Cycles, Mount="Surface Mount", Orientation=Straight, Packaging="Tape and Reel", Pricing 1="1=1, 10=0.961, 25=0.9064, 50=0.7976, 100=0.7251, 250=0.68888, 500=0.67074, 1000=0.52571 (USD)", REACH SVHC=Unknown, Stock 1=116454, Supplier 1=Digi-Key, Switch Function=Off-Mom, Switch Travel=0.15mm, Termination=SMD/SMT, Throw Configuration=SPST, Voltage Rating (DC)=12V, Weight=0.000776oz, Width=3mm
U1: "IC MCU 8BIT 16KB FLASH 20SOIC", Manufacturer=Microchip, Supplier Part Number 1=ATTINY1616-SFRCT-ND, ComponentLink1Description=https://4donline.ihs.com/images/VipMasterIC/IC/MCHP/MCHP-S-A0008147170/MCHP-S-A0008495385-1.pdf?src-supplier=Farnell, ComponentLink1URL=https://4donline.ihs.com/images/VipMasterIC/IC/MCHP/MCHP-S-A0008147170/MCHP-S-A0008495385-1.pdf?src-supplier=Farnell, Manufacturer Part Number=ATTINY1616-SFR, Pricing 1="1=0.92, 25=0.85, 100=0.77 (USD)", Stock 1=1061, Supplier 1=Digi-Key
U2: "RX TXRX MODULE BT TRC ANT SMD", Case/Package=SMD/SMT, Current - Receiving=25mA, Current - Transmitting=30mA, Frequency=2.4GHz, Manufacturer=Microchip, Max Operating Temperature=85°C, Max Supply Voltage=3.6V, Min Operating Temperature=-40°C, Min Supply Voltage=3V, Operating Supply Voltage=3.3V, Package Quantity=64, Supplier Part Number 1=740-1038-ND, ComponentLink1Description=http://www.microchip.com/mymicrochip/filehandler.aspx?ddocname=en572993&src-supplier=Digi-Key, ComponentLink1URL=http://www.microchip.com/mymicrochip/filehandler.aspx?ddocname=en572993&src-supplier=Digi-Key, ComponentLink2Description=http://ww1.microchip.com/downloads/en/DeviceDoc/rn-42-ds-v2.3r.pdf?src-supplier=Avnet, ComponentLink2URL=http://ww1.microchip.com/downloads/en/DeviceDoc/rn-42-ds-v2.3r.pdf?src-supplier=Avnet, ComponentLink3Description=http://ww1.microchip.com/downloads/en/DeviceDoc/rn-42-ds-v2.32r.pdf?src-supplier=Future+Electronics, ComponentLink3URL=http://ww1.microchip.com/downloads/en/DeviceDoc/rn-42-ds-v2.32r.pdf?src-supplier=Future+Electronics, ComponentLink4Description=http://ww1.microchip.com/downloads/en/DeviceDoc/rn-42-ds-v2.32r.pdf?src-supplier=Digi-Key, ComponentLink4URL=http://ww1.microchip.com/downloads/en/DeviceDoc/rn-42-ds-v2.32r.pdf?src-supplier=Digi-Key, ComponentLink5Description=http://uk.rs-online.com/webdocs/11a8/0900766b811a8f51.pdf?src-supplier=RSComponents, ComponentLink5URL=http://uk.rs-online.com/webdocs/11a8/0900766b811a8f51.pdf?src-supplier=RSComponents, ComponentLink6Description=http://www.farnell.com/datasheets/1728644.pdf?src-supplier=Element14, ComponentLink6URL=http://www.farnell.com/datasheets/1728644.pdf?src-supplier=Element14, Data Rate=3Mbps, Height=2mm, Interface=UART,SPI, Lead Free="Lead Free", Length=25.8mm, Manufacturer Part Number=RN42-I/RM, Mount="Surface Mount", Number of Pins=35, Packaging=Tray, Pricing 1="1=15.27, 25=13.85, 100=13.404 (USD)", Radiation Hardening=No, REACH SVHC="No SVHC", Sensitivity=-80dBm, Stock 1=3126, Supplier 1=Digi-Key, Width=13.4mm

## Free pads (board coordinates)
  round 0 hole 70 unplated: 3(20,284) 3(20,384) 3(22,900) 3(22,1000)
  oct 0x0 hole 80: MH(0,0) MH(0,1388) MH(1162,0) MH(1162,1388)
  oct 0x120 hole 80: MH(367,622)

## Via types
v1: diameter 23.62, hole 11.81, Top Layer to Bottom Layer, tented both sides, 33 vias
v2: diameter 23.62, hole 11.81, Top Layer to Bottom Layer, 3 vias

## Nets (pads, with @x,y where several pads share a name; then routed paths per layer and width w, separated by ;. In a path a pad name is that pad's centre, name@x,y a point inside that pad or via, vN(x,y) a via of type N, cw(c..) or ccw(c..) an arc to the next point about the centre after c; other vN are vias at no path point)
AIO_1: R4.2 U2.35 | length 445.6
  Top Layer w12: v1(219,909) 278.42,909 459,1089.58 R4.2
  Bottom Layer w12: v1(219,909) 288.62,909 U2.35
COIN_VBAT: C1.1 C2.1 C5.2 C6.2 J1.1 P2.1 R2.2 R3.2 R6.2 R7.2 R12.2 R13.2 U1.1 U2.11 | length 2963.9
  Top Layer w25: v1(69,791) 117,791 216,692 369,692 427,750 v1(527,750) 527,514 v1(658,383) 658.5,382.5 R3.2 R2.2 ; C2.1 554.5,1266 U1.1 ; 725.7,33.3 C6.2
  Bottom Layer w25: R13.2 62,465 3,524 3,671 40.5,708.5 R7.2 v1(69,791) 20,791 -42,853 -42,1023 20,1085 R12.2 ; C1.1@447.69,746.81 C1.1@448.5,746 ; U2.11 447.69,1231.69 v1(479,1263) ; v1(658,101) v1(658,383)
  other v1: 840,-14
GND: C1.2 C2.2 C3.2 C4.2 C5.1 C6.1 CF1.2 CF2.2 J1.2 P1.2 R4.1 R5.1 R8.1 R9.1 R10.1 R11.1 SW1.3 SW2.3 SW_1.2 SW_2.2 SWG1.2 SWR2.2 U1.20 U2.1 U2.12 U2.28 U2.29 | length 4687.8
  Top Layer w25: SW_2.2 164.17,228.83 SW2.3 302.17,228.83 375.5,155.5 823,155.5 ; SW1.3@207.52,843.42 167.58,843.42 SW_1.2 49,836 -10,836 -42,868 -42,1025 150,1217 v1(217,1217) ; 373,1208 373,1270 438,1335 R11.1@663,1335 ; 475,1203 494,1203 ; R11.1 663,1366 681,1384 823,1384 841,1366 R9.1@841,1338 ; R8.1 918,629 941,606 v1(999,606) 987.93,594.93 SWG1.2 987.93,200.93 948,161 849,161 ; R9.1@847,1338 872,1338 944,1266 U1.20
  Bottom Layer w25: SW_2.2 164,283 179.91,298.91 C4.2 ; SW_1.2 162.95,949.95 U2.29 370.05,949.95 400.44,919.56 U2.12 ; v1(217,1217) 239.95,1194.05 U2.28 ; v1(336,196) 269.5,262.5 269.5,618.6 369.9,719 379.85,719 ; C1.2@401.79,740.29 C1.2 ; U2.1 920.13,666.82 J1.2 998.69,666.69 P1.2
GPIO2: R11.2 U2.19 | length 183.3
  Top Layer w12: R11.2 723,1281.14 ccw(c757.14,1281.14) v1(733,1257)
  Bottom Layer w12: U2.19@683.91,1294.78 ccw(c721.78,1294.78) 695,1268 ccw(c721.56,1294.56) 721.56,1257 v1(733,1257)
  Bottom Layer w25: U2.19@683.91,1294.78 U2.19
GPIO4: CF2.1 R3.1 SWG1.1 U2.22 | length 1023.7
  Top Layer w12: R3.1 853.57,419.5 854,419.93 CF2.1 825.5,511.5 782.19,554.81 782.19,1140.19 825.64,1183.64 v1(825.64,1257)
  Bottom Layer w12: v1(825.64,1257) U2.22
GPIO5: R9.2 U2.21 | length 148.7
  Top Layer w12: v1(778,1257) ccw(c770.76,1264.24) 781,1264.24 R9.2
  Bottom Layer w12: v1(778,1257) ccw(c777.05,1257.95) 778.39,1257.95 U2.21
GPIO6: R8.2 U2.3 | length 123.3
  Top Layer w12: R8.2@825,697 v1(825,745)
  Bottom Layer w12: v1(825,745) 825,819.39 U2.3
GPIO9: R10.2 U2.32 | length 103.9
  Top Layer w12: R10.2@343,1141 R10.2 345.62,1140.38 v1(345.62,1095.62)
  Bottom Layer w12: U2.32 v1(345.62,1095.62)
GPIO10: R5.2 U2.33 | length 181.6
  Top Layer w12: v1(404,1095.62) R5.2
  Bottom Layer w12: U2.33 360,1048.38 404,1092.38 v1(404,1095.62)
LED1: LED1.2 U1.4 | length 786.3
  Top Layer w12: LED1.2 723.99,581.99 762,620 762,1081 727,1116 U1.4
LED2: LED2.2 U1.3 | length 980.1
  Top Layer w12: v2(69,586) 136.01,586 LED2.2@138.01,587.99 ; v1(252,750) 287,785 287,890.09 562.91,1166 U1.3
  Bottom Layer w12: v2(69,586) 152,586 252,686 v1(252,750) v1@258,750
NetLED1_1: LED1.1 R6.1 | length 175.9
  Top Layer w12: LED1.1 637.99,661.99 v2(647,671)
  Bottom Layer w12: R6.1 646.5,671.5 v2(647,671)
NetLED2_1: LED2.1 R7.1 | length 73.2
  Top Layer w25: LED2.1@138.01,667.99 v2(138.01,671.99)
  Bottom Layer w25: R7.1 137.5,671.5 v2(138.01,671.99)
NetP1_1: P1.1 R1.1 | length 123.2
  Top Layer w25: P1.1 1159.5,726.5 R1.1
PA1_: C3.1 R12.1 SW1.1 SW_1.1 U1.17 | length 1295.3
  Top Layer w12: SW_1.1 150,999 171.58,1020.58 SW1.1@207.52,1020.58 ; SW1.1 v1(351,1020.58) ; v1(401.79,969.79) v1(487,969.79) ; v1(842,1116) U1.17
  Top Layer w20: SW_1.1 112,1059 132.5,1079.5 v1(132.5,1123)
  Bottom Layer w12: v1(351,1020.58) v1(401.79,969.79) ; v1(487,969.79) 633.21,1116 v1(842,1116)
  Bottom Layer w20: v1(132.5,1123) R12.1 166,1085 207.52,1043.48 C3.1
PA2_: C4.1 R13.1 SW2.1 SW_2.1 U1.18 | length 2538.4
  Top Layer w12: v1(207.52,465) SW2.1 207.52,366.48 393,181 721,181 v1(787,247) ; U1.18 842,1166 802,1126 802,889.38 1051,640.38 v1(1051,247)
  Bottom Layer w12: SW_2.1 110,416 132.5,438.5 R13.1 v1(207.52,465) C4.1 ; v1(787,247) 904.65,247 v1(1051,247)
RESET_: CF1.1 P5.1 R2.1 SWR2.1 U2.5 | length 1161.8
  Top Layer w12: v1(733,294.5) R2.1 799.5,295 SWR2.1 852.07,209.57 CF1.1
  Bottom Layer w12: v1(520,101) 557,64 685,64 733,112 v1(733,294.5) 733,818.18 U2.5
RXD: P3.1 SW_3.1 U1.9 U2.13 | length 2594.1
  Top Layer w12: SW_3.1 325,158 v1(382,101) ; U1.9 687,866 v1(737,916) 737,778 v1(700,741)
  Bottom Layer w12: v1(382,101) 382,220 700,538 v1(700,741) ; U2.13 400.44,1364.44 432,1396 960,1396 992,1364 992,1171 v1(737,916)
TXD: P4.1 SW_3.2 U1.8 U2.14 | length 2442.1
  Top Layer w12: SW_3.2 201,58 v1(244,101) ; v1(337.62,731) 337.62,825.62 428,916 U1.8 v1(699,916)
  Bottom Layer w12: v1(244,101) 244,637.38 v1(337.62,731) ; U2.14 447.69,1366.69 458,1377 944,1377 970,1351 970,1187 v1(699,916)
UPDI_: R1.2 U1.16 | length 596.8
  Top Layer w12: U1.16 944,1066 944,774.25 1114.25,604 R1.2
pads on no net: J1.MH1 J1.MH2 SW1.2 SW1.4 SW2.2 SW2.4 U1.2 U1.5 U1.6 U1.7 U1.10 U1.11 U1.12 U1.13 U1.14 U1.15 U1.19 U2.2 U2.4 U2.6 U2.7 U2.8 U2.9 U2.10 U2.15 U2.16 U2.17 U2.18 U2.20 U2.23 U2.24 U2.30 U2.31 U2.34 U2.S1 U2.S2 U2.S3 U2.S4

## Polygon pours and split planes (outlines as drawn)
GND on Bottom Layer "Bottom Layer-GND" (hatched 45Degree grid 20 track 8, remove dead copper, pour order 1): 25,31 1147,31 1147,1352 25,1352
GND on Top Layer "Top Layer-GND" (hatched 45Degree grid 20 track 8, remove dead copper, pour order 2): 25,31 1147,31 1147,1352 25,1352

## Other copper
Top Layer:
  rectangle net COIN_VBAT: 624,25 692,116
  rectangle net COIN_VBAT: 457,1249 683,1295
  rectangle net GND: 807,552 1028,645
  rectangle net GND: 187,1180 577,1239
  rectangle net GND: 759,72 875,186
  rectangle net COIN_VBAT: 811,-47 1014,44
  rectangle net COIN_VBAT: 624,-10 1013,56
Bottom Layer:
  rectangle net GND: 903,740 939,861
  rectangle net COIN_VBAT: 431,698 544,763
  rectangle net GND: 875,564 1096,760
  rectangle net COIN_VBAT: 810,-48 1013,130
  rectangle net COIN_VBAT: 431,721 468.24,860
  rectangle net GND: 379,698 421,860

## Silkscreen, mask and mechanical layers (free items; w line width, h text height)
Top Overlay:
  drawing of 3073 lines, arcs and shapes, not listed
  text "*" at 525,1247 h40
  text "Round SW" at 234,738 h50
  text "BOOT HD" at 1003,632 h50
  text "Activity SW" at 229,437 h50
  text "*" at 793,95 h40
  text "TXD" at 196,-1 h50
  text "RXD" at 331,-1 h50
  text "RST" at 471,-1 h50
  text "VBATT." at 579,-1 h50
Bottom Overlay:
  drawing of 27 lines, arcs and shapes, not listed
  text "*" at 197.45,1008 h40
  text "# > 0.1uF" at 295,754 h60 r90
  text "*" at 355.5,722 h40
  text "*" at 194.49,360 h40
Mechanical 1:
  circle w10: c595,622 r139.21
  circle w10: c138,622 r139.21
  text "For LED Covering, don't mount any part near or inside the circle." at 1403,163 h40
Mechanical 2:
  lines w10: -69,1344.28 cw(c40.72,1344.28) 40.72,1454 86,1454 ccw(c131,1454) 131,1409 cw(c176,1409) 176,1454 326,1454 cw(c326,1409) 371,1409 461,1409 cw(c506,1409) 506,1454 656,1454 cw(c656,1409) 701,1409 791,1409 cw(c836,1409) 836,1454 986,1454 cw(c986,1409) 1031,1409 ccw(c1031,1454) 1076,1454 1121.28,1454 cw(c1121.28,1344.28) 1231,1344.28 ; -69,1351 -69,1299 cw(c-69,1254) -24,1254 -24,1104 cw(c-69,1104) -69,1059 -69,969 -69,729 -69,639 cw(c-69,594) -24,594 -24,454 cw(c-69,454) -69,409 -69,319 cw(c-69,274) -24,274 -24,134 cw(c-69,134) -69,89 -69,43.72 ; 1231,1349 1231,1299 ccw(c1231,1254) 1186,1254 1186,1104 ccw(c1231,1104) 1231,1059 1231,969 1231,729 1231,639 ccw(c1231,594) 1186,594 1186,454 ccw(c1231,454) 1231,409 1231,319 ccw(c1231,274) 1186,274 1186,134 ; -69,43.72 ccw(c-69,43.72) -69,43.72 ; -69,43.72 ccw(c40.72,43.72) 40.72,-66 86,-66 cw(c131,-66) 131,-21 ccw(c176,-21) 176,-66 326,-66 ccw(c326,-21) 371,-21 461,-21 ccw(c506,-21) 506,-66 656,-66 ccw(c656,-21) 701,-21 791,-21 ccw(c836,-21) 836,-66 986,-66 ccw(c986,-21) 1031,-21 cw(c1031,-66) 1076,-66 1121.28,-66 ccw(c1121.28,43.72) 1231,43.72 ; 1186,134 ccw(c1231,134) 1231,89 ; 1186,134 ccw(c1231,134) 1231,89 ; 1231,43.72 ccw(c1231,43.72) 1231,43.72 ; 1231,43.72 1231,89

## Dimensions
-69,1299 to 1305.95,1335.78 on Mechanical 1
0,0 to 1162,0 on Mechanical 1
1162,1388 to 1162,0 on Mechanical 1
86,1454 to 86,-66 on Mechanical 1
-69,1299 to 1231,1299 on Mechanical 1